# Altium PCB Zotino-DIOT.PCBDOC (part 6 of 11)
Units mil, origin at the board's own origin, x right, y up, seen from the top; angles counter-clockwise.
Board outline 8771.61 x 3949.04 mil, 4 copper layers (TopLayer, Internal Plane 2, Signal Layer 1, BottomLayer), stack 61.54 mil thick; 915 components, 534 nets, 3073 pads, 1180 vias.
Unrouted connection lines stored in the file: 36.
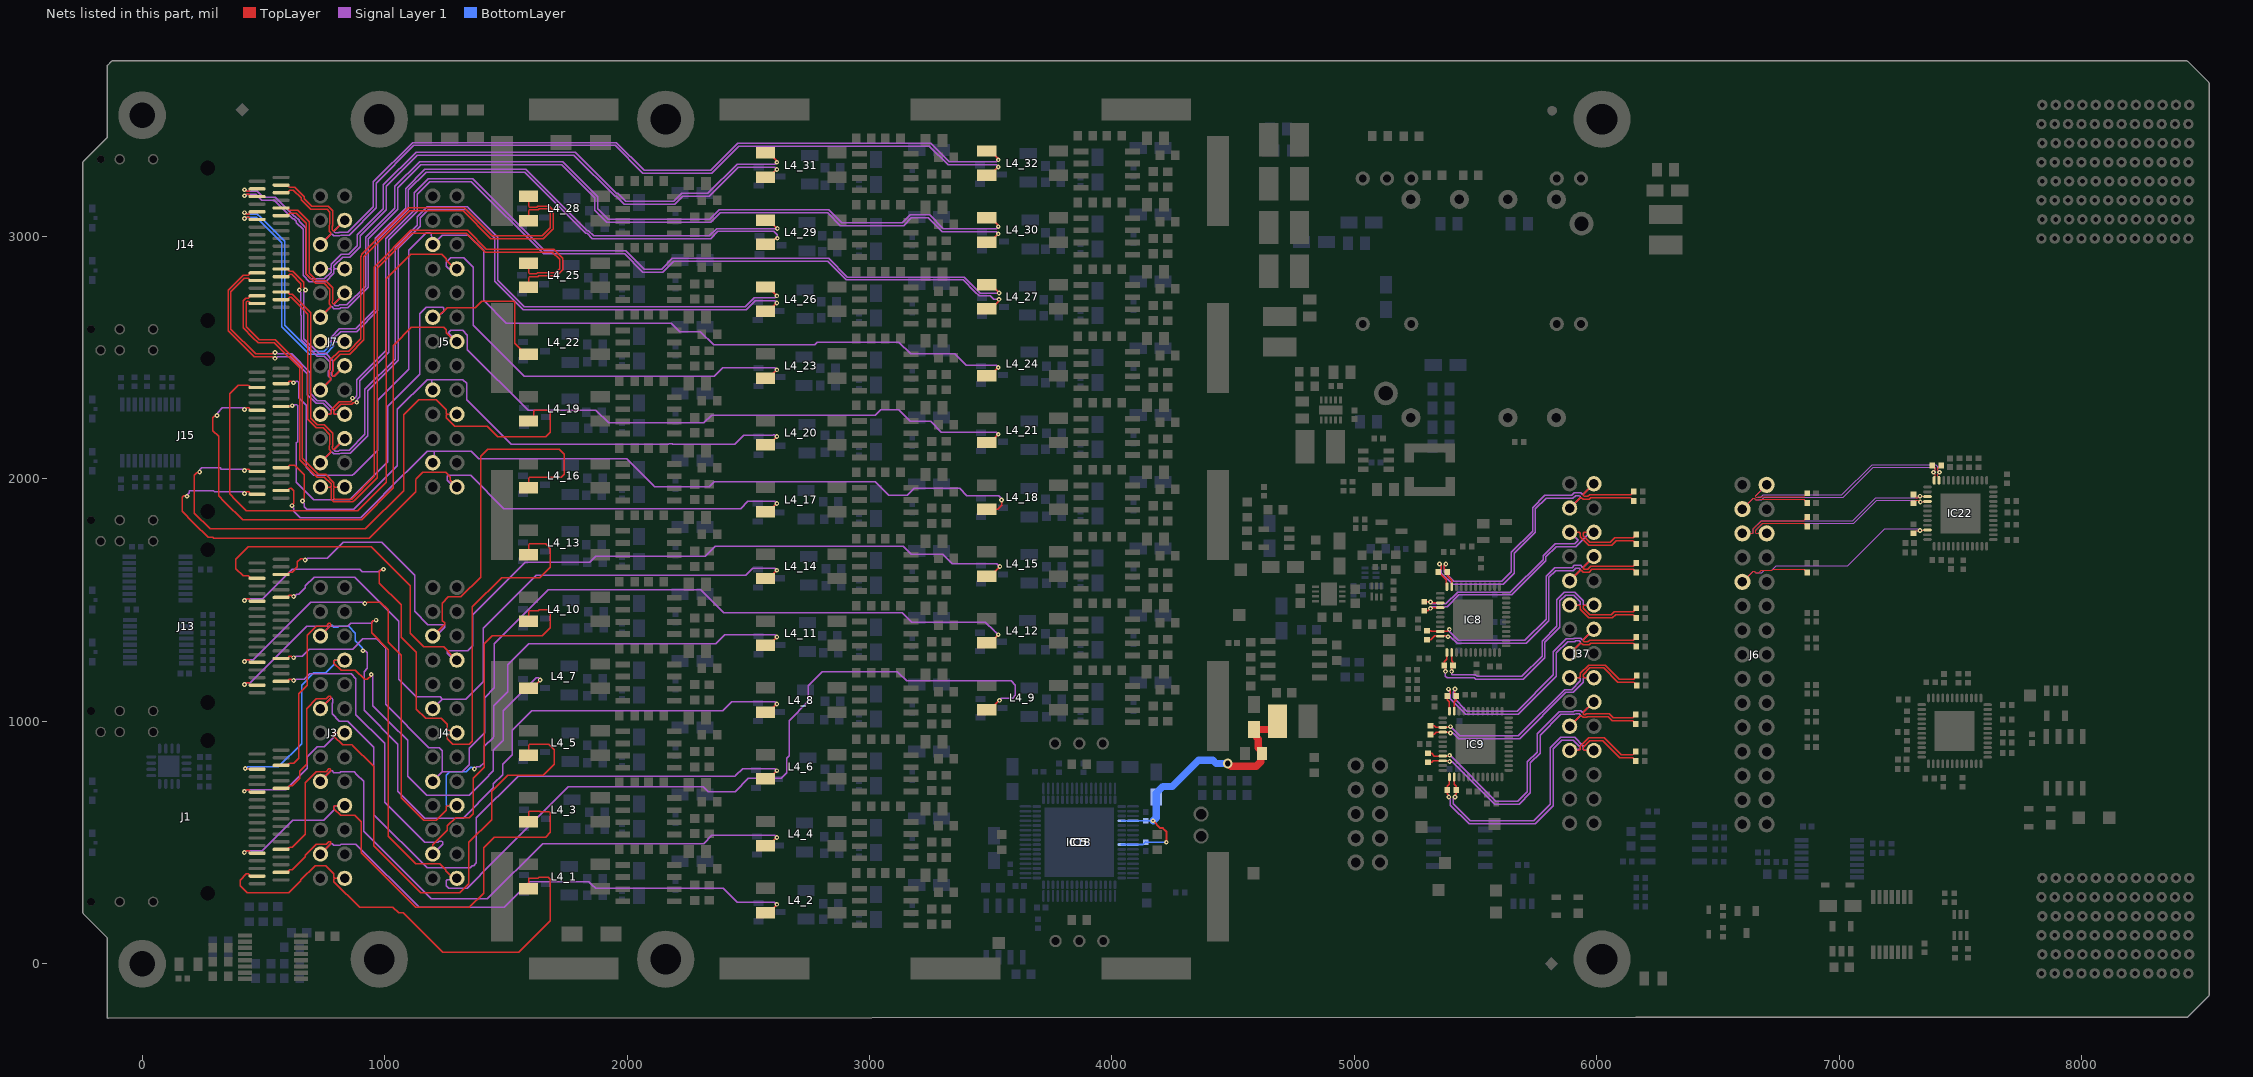
[diagram p7: the nets of this part, all layers, seen from the top]

## Via types
v1: diameter 19.68, hole 7.87, TopLayer to BottomLayer, tented both sides, 1050 vias
v2: diameter 23.62, hole 11.81, TopLayer to BottomLayer, tented both sides, 56 vias
v3: diameter 23.62, hole 11.81, TopLayer to BottomLayer, 28 vias
v4: diameter 39.37, hole 23.62, TopLayer to BottomLayer, tented both sides, 28 vias
v5: diameter 39.37, hole 19.68, TopLayer to BottomLayer, tented both sides, 7 vias
v6: diameter 19.68, hole 7.87, TopLayer to BottomLayer, tented bottom, 7 vias
v7: diameter 19.68, hole 7.87, TopLayer to BottomLayer, 4 vias

## Nets (pads, with @x,y where several pads share a name; then routed paths per layer and width w, separated by ;. In a path a pad name is that pad's centre, name@x,y a point inside that pad or via, vN(x,y) a via of type N, cw(c..) or ccw(c..) an arc to the next point about the centre after c; other vN are vias at no path point) (continued)
DAC_OUT_N25: J7.2 J14.A3 L4_25.3 | length 3307.9
  TopLayer w6: J14.A3@474.17,2755.44 447.74,2755.44 441.74,2749.45 441.74,2749.21 438.23,2745.69 427.94,2745.69 417.39,2735.15 417.39,2622.72 457.07,2583.05 477.78,2562.34 544.76,2562.34 552.54,2554.56 649.15,2457.95 649.15,2079.93 692.88,2036.19 721.87,2007.2 751.97,2007.2 779.19,1979.98 779.19,1970.22 775.68,1966.71 ; J7.2@735.19,1966.71 775.68,1966.71 ; L4_25.3@1594.08,2890.12 1594.08,2849.63 1597.59,2846.12 1626.41,2846.12 1630.73,2850.43 1675.07,2850.43 1675.3,2850.66 1704.72,2850.66 1722.03,2867.97 1722.03,2905.7 1691.75,2935.97 1414.41,2935.97 1337.38,3013 1112.84,3013 969.68,2869.84 969.68,2005.86 962.65,1998.83 875.97,1912.15 868.94,1905.12 790.36,1905.12 779.19,1916.29 779.19,1963.19 775.68,1966.71
DAC_OUT_N26: J7.5 J14.B3 L4_26.3 | length 3909.2
  TopLayer w6: J14.B3@572.99,2771.19 599.43,2771.19 605.43,2765.19 605.43,2764.96 608.94,2761.44 619.23,2761.44 672.2,2708.47 695.7,2684.97 695.7,2650.35 695.93,2650.11 695.93,2571.93 cw(c677.93,2571.93) 695.87,2570.36 ; 695.86,2570.31 ccw(c735.19,2566.71) 695.7,2566.71 695.7,2283.07 695.7,2250.35 711.83,2234.22 722.45,2223.59 751.14,2223.59 786.69,2188.04 786.69,2135.17 783.44,2131.92 783.44,2126.95 786.95,2123.44 791.92,2123.44 J7.5@835.19,2166.71 ; L4_26.3@2570.45,2791.69 2581.53,2791.69 v1(2617.93,2755.3)
  Signal Layer 1 w6: J7.5@835.19,2166.71 791.92,2123.44 791.92,2118.47 795.44,2114.95 810.61,2114.95 813.86,2118.2 853.3,2118.2 919.04,2183.94 919.04,2369.35 1044.29,2494.6 1044.29,2955.71 1051.32,2962.74 1135.64,3047.06 1135.64,3081.81 1142.67,3088.84 1168.57,3114.74 1175.6,3121.77 1341.93,3121.77 1345.44,3118.26 1464.33,2999.37 1466.49,2997.21 1466.49,2819.96 1576.56,2709.89 2487.22,2709.89 2523.87,2746.53 2609.16,2746.53 v1(2617.93,2755.3)
DAC_OUT_N27: J7.8 J14.A6 L4_27.3 | length 4852.9
  TopLayer w6: J14.A6@474.17,2849.93 447.74,2849.93 441.74,2843.93 441.74,2843.7 438.23,2840.18 416.71,2840.18 354.14,2777.61 354.14,2612.16 427.54,2538.76 462.55,2503.75 539.37,2503.75 545.71,2497.41 v1(548.23,2497.41) ; J7.8@735.19,2266.71 775.68,2266.71 779.19,2270.22 779.19,2284.95 813.45,2319.2 859.71,2319.2 864.68,2324.17 864.68,2330.67 v1(867.3,2333.29) ; L4_27.3@3483.84,2801.54 3488.38,2797 3506,2797 3535,2768 v1(3535,2767)
  Signal Layer 1 w6: v1(548.23,2497.41) 551.93,2497.41 558.27,2503.75 611.41,2503.75 669.29,2445.87 681.1,2434.06 681.1,2347.97 717.59,2311.48 747.69,2311.48 779.19,2279.98 779.19,2270.22 775.68,2266.71 J7.8@735.19,2266.71 ; v1(867.3,2333.29) 869.92,2335.91 878.68,2335.91 886.07,2343.3 886.07,2409.7 1004.92,2528.54 1004.92,2991.14 1011.95,2998.17 1122.88,3109.1 1122.88,3180.13 1180.46,3237.71 1363.21,3237.71 1366.72,3234.19 1660,2940.92 1994.56,2940.92 2070,2865.48 2142.48,2865.48 2186.89,2909.89 2831.97,2909.89 2908.86,2833 3391.6,2833 3457.6,2767 v1(3535,2767)
DAC_OUT_N28: J7.11 J14.B6 L4_28.3 | length 2439.1
  TopLayer w6: J14.B6@572.99,2865.68 599.43,2865.68 605.43,2859.68 605.43,2859.44 608.94,2855.93 621.67,2855.93 666.55,2811.06 666.55,2789.88 673.23,2783.2 v1(673.23,2779.53) ; J7.11@835.19,2466.71 791.92,2423.44 786.95,2423.44 783.44,2426.95 783.44,2442.12 788.2,2446.89 788.2,2485.8 817.62,2515.21 856.52,2515.21 914.56,2573.25 914.56,2915.59 cw(c920.56,2915.59) 916.3,2919.82 919.83,2923.34 1102.69,3106.2 1323.55,3106.2 1438.76,2991 1654.97,2991 1691.32,3027.35 1694.83,3030.86 1694.83,3109.77 1691.32,3113.29 1678.81,3125.79 1632.49,3125.79 1628.4,3121.71 1597.59,3121.71 1594.08,3125.23 L4_28.3@1594.08,3165.71
  Signal Layer 1 w6: v1(673.23,2779.53) 673.23,2775.82 666.95,2769.55 666.95,2681.19 667.32,2680.82 667.32,2578.72 727.84,2518.2 756.52,2518.2 786.69,2488.04 786.69,2445.38 779.92,2438.61 779.92,2430.47 786.95,2423.44 791.92,2423.44 J7.11@835.19,2466.71
DAC_OUT_N29: J7.14 J14.A14 L4_29.3 | length 3518.8
  TopLayer w6: v1(422.48,3098.49) 425.87,3098.49 432.21,3092.15 441.01,3092.15 441.74,3092.88 441.74,3095.9 447.74,3101.9 J14.A14@474.17,3101.9 ; L4_29.3@2570.46,3067.28 2585.72,3067.28 v1(2620,3033)
  Signal Layer 1 w6: J7.14@735.19,2566.71 775.68,2566.71 779.19,2570.22 779.19,2584.95 813.45,2619.2 880.03,2619.2 960.63,2699.8 960.63,2991.95 967.66,2998.98 1086.17,3117.49 1086.17,3197.16 1166.1,3277.09 1582.44,3277.09 1834.97,3024.57 1839.94,3024.57 1862.03,3002.48 2339.48,3002.48 2370,3033 v1(2620,3033)
  BottomLayer w6: v1(422.48,3098.49) 426.18,3098.49 432.53,3092.15 474.78,3092.15 488.19,3078.74 587.23,2979.7 587.23,2633.44 694.45,2526.21 751.97,2526.21 779.19,2553.44 779.19,2563.19 775.68,2566.71 J7.14@735.19,2566.71
DAC_OUT_N30: J7.17 J14.B14 L4_30.3 | length 4103.1
  TopLayer w6: J14.B14@572.99,3117.65 599.43,3117.65 605.43,3111.65 605.43,3111.41 608.94,3107.9 641.36,3107.9 689.17,3060.09 689.17,2849.22 718.5,2819.88 720.18,2818.2 756.52,2818.2 786.69,2788.04 786.69,2735.17 783.44,2731.92 783.44,2726.95 786.95,2723.44 791.92,2723.44 J7.17@835.19,2766.71 ; L4_30.3@3483.84,3077.13 3500.87,3077.13 3531.31,3046.69 v1(3531.31,3040.73)
  Signal Layer 1 w6: J7.17@835.19,2766.71 791.92,2723.44 791.92,2718.47 795.44,2714.95 810.61,2714.95 813.86,2718.2 843.96,2718.2 921.26,2795.5 921.26,2996.64 928.29,3003.67 1041.58,3116.96 1041.58,3206.31 1144.05,3308.78 1735.05,3308.78 1749.62,3294.2 1879.06,3164.77 1879.06,3113.94 1921.6,3071.4 2341.32,3071.4 2379.8,3109.89 2831.84,3109.89 2884.73,3057 3136.03,3057 3168.03,3089 3248,3089 3305.03,3031.97 3522.55,3031.97 v1(3531.31,3040.73)
DAC_OUT_N31: J7.20 J14.A17 L4_31.3 | length 3099.9
  TopLayer w6: v1(422.48,3192.98) 425.87,3192.98 432.21,3186.64 441.01,3186.64 441.74,3187.37 441.74,3190.39 447.74,3196.39 J14.A17@474.17,3196.39 ; L4_31.3@2570.63,3344.81 2585.59,3344.81 2617.93,3312.48 v1(2617.93,3306.48)
  Signal Layer 1 w6: v1(422.48,3192.98) 426.18,3192.98 432.53,3186.64 473.99,3186.64 499.02,3161.61 549.26,3161.61 627.37,3083.5 630.22,3083.5 647.11,3066.6 647.11,3063.76 675.39,3035.48 675.39,2845.47 694.65,2826.21 751.97,2826.21 779.19,2853.44 779.19,2863.19 775.68,2866.71 ; J7.20@735.19,2866.71 775.68,2866.71 ; v1(2617.93,3306.48) 2609.16,3297.72 2453.67,3297.72 2333.84,3177.89 2225.03,3177.89 2192.14,3145 1993.67,3145 1960.78,3177.89 1955.81,3177.89 1801.49,3332.2 1785.55,3348.15 1129.68,3348.15 994.04,3212.51 994.04,3114.65 893.84,3014.45 886.81,3007.42 886.81,2962.47 851.55,2927.21 821.46,2927.21 779.19,2884.95 779.19,2870.22 775.68,2866.71
DAC_OUT_N32: J7.23 J14.B17 L4_32.3 | length 3629.5
  TopLayer w6: J14.B17@572.99,3212.13 599.43,3212.13 605.43,3206.14 605.43,3205.9 608.94,3202.39 628.99,3202.39 667.51,3163.86 667.51,3156.5 699.99,3124.02 768.04,3124.02 786.69,3105.36 786.69,3045.38 783.44,3042.12 783.44,3026.95 786.95,3023.44 791.92,3023.44 J7.23@835.19,3066.71 ; L4_32.3@3483.84,3352.72 3500.28,3352.72 3531.31,3321.69 v1(3531.31,3316.32)
  Signal Layer 1 w6: J7.23@835.19,3066.71 791.92,3023.44 791.92,3018.47 795.44,3014.95 810.61,3014.95 813.86,3018.2 848.91,3018.2 953.39,3122.68 953.39,3225.6 1115.31,3387.52 1956.18,3387.52 2070,3273.7 2344.65,3273.7 2455.95,3385 3251.73,3385 3329.17,3307.56 3522.55,3307.56 v1(3531.31,3316.32)
DAC_OUT_P1: J1.A2 J3.1 L4_1.4 | length 2018.3
  TopLayer w6: J1.A2@474.17,361.74 447.74,361.74 441.74,367.73 441.74,367.97 438.23,371.49 429.56,371.49 403.54,345.47 403.54,322.83 433.46,292.92 604.57,292.92 654.77,343.12 654.77,346.35 713.45,405.03 756.94,405.03 791.19,370.78 791.19,356.05 794.71,352.53 ; J3.1@835.19,352.53 794.71,352.53 ; L4_1.4@1594.08,309.81 1594.08,350.29 1597.59,353.81 1633.41,353.81 1635.96,356.36 1675.37,356.36 1682.83,348.9 1682.83,176.88 1553.84,47.89 1238.81,47.89 1076.7,210 1057.44,210 1034.55,232.89 897.57,232.89 791.19,339.26 791.19,349.02 794.71,352.53
DAC_OUT_P2: J1.B2 J3.4 L4_2.4 | length 2488.7
  TopLayer w6: J1.B2@572.99,377.49 599.43,377.49 605.43,383.48 605.43,383.72 608.94,387.24 619.23,387.24 673.07,441.07 673.07,447.68 718.42,493.03 758.72,493.03 769.98,504.29 774.95,504.29 778.47,500.78 778.47,495.81 J3.4@735.19,452.53 ; L4_2.4@2570.46,211.38 2586.38,211.38 2617.93,242.93 v1(2617.93,245.46)
  Signal Layer 1 w6: J3.4@735.19,452.53 778.47,495.81 783.44,495.81 790.47,488.78 815.58,488.78 820.49,493.69 881.19,493.69 1141.99,232.89 1493.95,232.89 1599.65,338.58 1842.52,338.58 1854.33,326.77 1870.08,311.02 2397.64,311.02 2425.2,283.46 2454.44,254.22 2607.57,254.22 2616.33,245.46 v1(2617.93,245.46)
DAC_OUT_P3: J1.A5 J3.7 L4_3.4 | length 2205.5
  TopLayer w6: v1(421.26,459.63) 424.96,459.63 431.31,465.98 440.1,465.98 441.74,464.34 441.74,462.22 447.74,456.23 J1.A5@474.17,456.23 ; J3.7@835.19,652.53 794.71,652.53 791.19,649.02 791.19,639.26 818.42,612.04 851.97,612.04 852.14,612.21 875.84,612.21 902.75,585.3 902.75,458.71 1128.46,233 1350,233 1408.29,291.29 1408.29,478.26 1453.03,523 1663.91,523 1682.83,541.92 1682.83,624.49 1679.37,627.94 1640.97,627.94 1639.52,629.4 1597.59,629.4 1594.08,625.88 L4_3.4@1594.08,585.4
  Signal Layer 1 w6: v1(421.26,459.63) 424.96,459.63 431.31,465.98 494.76,465.98 620.81,592.03 748.93,592.03 791.19,634.29 791.19,649.02 794.71,652.53 J3.7@835.19,652.53
DAC_OUT_P4: J1.B5 J3.10 L4_4.4 | length 2951.5
  TopLayer w6: J1.B5@572.99,471.98 599.43,471.98 605.43,477.97 605.43,478.21 608.94,481.72 619.23,481.72 671.61,534.11 671.61,746.22 718.42,793.03 758.72,793.03 769.98,804.29 774.95,804.29 778.47,800.78 778.47,795.81 J3.10@735.19,752.53 ; L4_4.4@2570.45,486.97 2583.85,486.97 v1(2617.93,521.05)
  Signal Layer 1 w6: J3.10@735.19,752.53 778.47,795.81 783.44,795.81 790.47,788.78 815.58,788.78 818.83,792.03 874.31,792.03 885.83,780.51 913.2,753.14 913.2,547.43 1192.91,267.72 1424.38,267.72 1652.55,495.89 2315.77,495.89 2349.69,529.81 2609.16,529.81 v1(2617.93,521.05)
DAC_OUT_P5: J1.A13 J3.13 L4_5.4 | length 2639.5
  TopLayer w6: v1(421.26,711.6) 424.96,711.6 431.31,717.94 440.1,717.94 441.74,716.31 441.74,714.19 447.74,708.2 J1.A13@474.17,708.2 ; J3.13@835.19,952.53 794.71,952.53 791.19,949.02 791.19,939.26 826.43,904.03 865.94,904.03 869.49,900.49 951.4,818.57 954.91,815.06 954.91,486.38 1148.29,293 1310,293 1348,331 1348,500.57 1442.49,595.06 1442.49,712.46 1507.16,777.13 1654.45,777.13 1700,822.68 1700,882.91 1693.44,889.47 1677.92,904.99 1597.59,904.99 1594.08,901.47 L4_5.4@1594.08,860.99
  Signal Layer 1 w6: v1(421.26,711.6) 424.96,711.6 431.31,717.94 591.48,717.94 680.39,806.86 680.39,853.59 721.67,894.87 751.77,894.87 791.19,934.29 791.19,949.02 794.71,952.53 J3.13@835.19,952.53
DAC_OUT_P6: J1.B13 J3.16 L4_6.4 | length 3321.5
  TopLayer w6: J1.B13@572.99,723.94 599.43,723.94 605.43,729.94 605.43,730.18 608.94,733.69 619.23,733.69 650.47,764.93 650.47,794.97 678.34,822.83 678.34,1052.95 718.42,1093.03 758.72,1093.03 769.98,1104.29 774.95,1104.29 778.47,1100.78 778.47,1095.81 J3.16@735.19,1052.53 ; L4_6.4@2570.46,762.56 2583.85,762.56 v1(2617.93,796.64)
  Signal Layer 1 w6: J3.16@735.19,1052.53 778.47,1095.81 783.44,1095.81 786.95,1092.29 786.95,1077.12 783.7,1073.87 783.7,1031.2 813.86,1001.04 847.39,1001.04 874.69,973.73 954.54,893.89 954.54,615.85 1175.15,395.23 1353.7,395.23 1362.36,403.89 1366.81,403.89 1378.84,415.92 1378.84,602.18 1551.04,774.37 2445.32,774.37 2448.84,777.89 2476.35,805.4 2609.16,805.4 v1(2617.93,796.64)
DAC_OUT_P7: J1.A16 J3.19 L4_7.4 | length 2511.1
  TopLayer w6: v1(425.2,806.09) 427.11,804.17 472.69,804.17 J1.A16@474.17,802.68 ; J3.19@835.19,1252.53 794.71,1252.53 791.19,1249.02 791.19,1239.26 820.14,1210.32 879.89,1210.32 917.32,1172.89 928.84,1172.89 945,1189.05 v1(945,1192.89) ; L4_7.4@1576.42,1136.58 L4_7.4@1594.08,1136.58 1607.47,1136.58 v1(1641.55,1170.65)
  Signal Layer 1 w6: v1(945,1192.89) 951.84,1186.05 951.84,1065.02 1023.64,993.22 1095.47,921.38 1095.47,774.58 1174.16,695.89 1348.81,695.89 1410.84,757.92 1448.84,795.92 1448.84,880.78 1485.23,917.17 1488.74,920.68 1488.74,1043.15 1625,1179.42 1632.78,1179.42 v1(1641.55,1170.65)
  BottomLayer w6: v1(425.2,806.09) 428.9,806.09 435.24,812.43 454.05,812.43 561.69,812.43 657.48,908.23 657.48,1149.42 708.1,1200.04 756.94,1200.04 791.19,1234.29 791.19,1249.02 794.71,1252.53 J3.19@835.19,1252.53 ; v1@945,1188 v1(945,1192.89)
DAC_OUT_P8: J1.B16 J3.22 L4_8.4 | length 3678.6
  TopLayer w6: J1.B16@572.99,818.43 599.43,818.43 605.43,824.43 605.43,824.67 608.94,828.18 624.68,828.18 644.87,848.38 644.87,1113.38 680.31,1148.81 680.31,1354.92 718.42,1393.03 758.72,1393.03 769.98,1404.29 774.95,1404.29 778.47,1400.78 778.47,1395.81 J3.22@735.19,1352.53 ; L4_8.4@2570.45,1038.15 2583.85,1038.15 v1(2617.93,1072.23)
  Signal Layer 1 w6: v1(910.43,1291.34) 912.92,1288.85 922.6,1288.85 928.6,1282.85 928.6,1218.69 915.15,1205.25 915.15,1046.27 1054.93,906.49 1054.93,711.56 1067,699.5 1165.46,601.04 1323.96,601.04 1448.84,725.92 1448.84,742.18 1486.84,780.18 1486.84,822.84 1526.74,862.74 1526.74,964.02 1607.1,1044.37 2395.32,1044.37 2398.84,1047.89 2431.94,1080.99 2609.16,1080.99 v1(2617.93,1072.23)
  BottomLayer w6: J3.22@735.19,1352.53 778.47,1395.81 783.44,1395.81 790.47,1388.78 807.99,1388.78 811.25,1392.03 851.55,1392.03 879.62,1363.96 879.62,1331.83 907.95,1303.5 907.95,1293.82 v1(910.43,1291.34)
DAC_OUT_P9: J4.1 J13.A2 L4_9.4 | length 5180.5
  TopLayer w6: v1(422.17,1152.55) 425.87,1152.55 432.21,1158.89 441.01,1158.89 441.74,1158.16 441.74,1155.14 447.74,1149.14 J13.A2@474.17,1149.14 ; v1(965.29,1417.58) 962.67,1414.97 953.7,1414.97 947.48,1408.75 947.48,1364.77 1015.84,1296.41 1015.84,525.89 1128.69,413.04 1227.46,413.04 1251.8,388.69 1251.8,383.72 1282.99,352.53 J4.1@1298.29,352.53 ; L4_9.4@3483.84,1047.99 3497.24,1047.99 v1(3536.16,1086.91)
  Signal Layer 1 w6: v1(422.17,1152.55) 425.87,1152.55 432.21,1158.89 446.53,1158.89 679.67,1392.03 847.52,1392.03 860.72,1405.23 943.97,1405.23 953.7,1414.97 962.67,1414.97 v1(965.29,1417.58) ; J4.1@1298.29,352.53 1292.26,346.51 1257.8,346.51 1254.28,343 1254.28,321.74 1264.81,311.21 1340.06,311.21 1393.84,365 1393.84,366.41 1758.49,731.06 2172.29,731.06 2172.61,730.75 2187.39,730.75 2187.71,731.06 2314.03,731.06 2334.73,710.35 2446.3,710.35 2500.84,764.89 2635.84,764.89 2658.84,787.89 2658.84,847.89 2668.84,857.89 2668.84,1002.89 2748,1082.05 2748,1147.97 2801.51,1201.49 2805.03,1205 3114.97,1205 3118.49,1201.49 3153.02,1166.95 3584.97,1166.95 3602.31,1149.61 3602.31,1106.77 3590.31,1094.77 3544.01,1094.77 v1(3536.16,1086.91)
DAC_OUT_P10: J4.4 J13.B2 L4_10.4 | length 2764.1
  TopLayer w6: J13.B2@572.99,1164.89 599.43,1164.89 605.43,1170.88 605.43,1173.91 606.16,1174.64 614.95,1174.64 621.3,1168.3 v1(625,1168.3) ; J4.4@1198.29,452.53 1198.29,491.29 1258.79,551.79 1258.79,568.89 1292.89,603 1350,603 1365.8,618.8 1365.8,765.77 1410.84,810.81 1410.84,1320.81 1443.03,1353 1650,1353 1682.83,1385.83 1682.83,1451.26 1673.84,1460.25 1637.46,1460.25 1633.37,1456.17 1597.59,1456.17 1594.08,1452.65 L4_10.4@1594.08,1412.17
  Signal Layer 1 w6: v1(625,1168.3) 628.7,1168.3 635.05,1174.64 668.73,1174.64 690.38,1196.29 861.78,1196.29 881.89,1176.18 881.89,1028 1000,909.89 1000,666.1 1067.61,598.49 1165.06,501.04 1219.62,501.04 1224.47,505.89 1235.84,505.89 1238.84,502.89 1238.84,493.09 J4.4@1198.29,452.53
DAC_OUT_P11: J4.7 J13.A5 L4_11.4 | length 3894.7
  TopLayer w6: v1(422.17,1247.04) 425.87,1247.04 432.21,1253.38 441.01,1253.38 441.74,1252.65 441.74,1249.62 447.74,1243.63 J13.A5@474.17,1243.63 ; v1(918.31,1485.69) 922.01,1485.69 928.35,1492.03 982.38,1492.03 1014.57,1459.83 1014.57,1326.96 1029.22,1312.31 1068.71,1272.83 1068.71,684.01 1117.19,635.52 1160.68,592.03 1212.02,592.03 1254.29,634.29 1254.29,649.02 1257.8,652.53 J4.7@1298.29,652.53 ; L4_11.4@2570.45,1313.74 2583.85,1313.74 v1(2617.93,1347.82)
  Signal Layer 1 w6: v1(422.17,1247.04) 425.87,1247.04 432.21,1253.38 457.36,1253.38 696.01,1492.03 908.26,1492.03 914.6,1485.69 v1(918.31,1485.69) ; v1(1370,803) 1371.36,803 1380.36,812 1392.62,812 1410.84,830.22 1410.84,896.52 1447.23,932.91 1450.74,936.42 1450.74,1065.14 1508.51,1122.91 1508.51,1234.54 1594.86,1320.89 2366.84,1320.89 2402.53,1356.58 2609.16,1356.58 v1(2617.93,1347.82)
  BottomLayer w6: J4.7@1298.29,652.53 1257.8,652.53 1254.29,656.05 1254.29,777.65 1268.67,792.03 1336.63,792.03 1350.5,805.9 1350.5,806.61 1354.67,810.78 1359.64,810.78 1367.43,803 v1(1370,803)
DAC_OUT_P12: J4.10 J13.B5 L4_12.4 | length 4151
  TopLayer w6: J13.B5@572.99,1259.38 599.43,1259.38 605.43,1265.37 605.43,1268.39 606.16,1269.13 614.95,1269.13 621.3,1262.78 v1(625,1262.78) ; L4_12.4@3483.84,1323.58 3497.24,1323.58 v1(3531.31,1357.66)
  Signal Layer 1 w6: v1(625,1262.78) 628.7,1262.78 635.05,1269.13 659.87,1269.13 688.79,1298.04 867.92,1298.04 910.43,1340.55 967.52,1340.55 984.25,1323.82 1003.84,1304.23 1003.84,1069.71 1181.52,892.03 1224.66,892.03 1237.78,878.91 1237.78,792.03 ; J4.10@1198.29,752.53 1237.78,792.03 ; v1(3531.31,1357.66) 3519.6,1369.37 3517.35,1369.37 3513.84,1372.89 3477.32,1409.4 3173.6,1409.4 3135.11,1447.89 2397.87,1447.89 2303.76,1542 1674.92,1542 1475.58,1342.66 1473.76,1340.84 1472.61,1340.84 1452.84,1321.07 1452.84,1137.95 1412.74,1097.85 1412.74,952.16 1409.23,948.65 1349.98,889.4 1349.98,822.06 1319.95,792.03 1237.78,792.03
DAC_OUT_P13: J4.13 J13.A13 L4_13.4 | length 2904
  TopLayer w6: v1(422.17,1499) 425.87,1499 432.21,1505.35 441.01,1505.35 441.74,1504.61 441.74,1501.59 447.74,1495.6 J13.A13@474.17,1495.6 ; v1(994.92,1627.68) 992.3,1625.06 986.22,1625.06 978.56,1617.39 978.56,1570.66 1067.84,1481.37 1067.84,1347.12 1130.84,1284.12 1130.84,1050.89 1168.84,1012.89 1232.76,1012.89 1257.66,987.99 1257.66,965.29 1259.51,963.44 1287.38,963.44 J4.13@1298.29,952.53 1289.93,944.18 1257.66,944.18 1257.66,928.91 1281.63,904.93 1348.54,904.93 1362.29,918.68 1362.29,1472.26 1483.03,1593 1639.1,1593 1682.83,1636.73 1682.83,1712.6 1663.68,1731.76 1597.59,1731.76 1594.08,1728.24 L4_13.4@1594.08,1687.76
  Signal Layer 1 w6: v1(422.17,1499) 425.87,1499 432.21,1505.35 496.73,1505.35 619.23,1627.85 896.52,1627.85 907.87,1616.49 974.72,1616.49 983.28,1625.06 992.3,1625.06 v1(994.92,1627.68)
DAC_OUT_P14: J4.16 J13.B13 L4_14.4 | length 2914.9
  TopLayer w6: J13.B13@572.99,1511.35 599.43,1511.35 605.43,1517.34 605.43,1520.36 606.16,1521.09 614.95,1521.09 621.3,1514.75 v1(625,1514.75) ; L4_14.4@2570.45,1589.33 2583.85,1589.33 v1(2617.93,1623.41)
  Signal Layer 1 w6: v1(625,1514.75) 628.7,1514.75 637.42,1523.47 645.3,1523.47 673.38,1551.55 673.38,1559.21 709.65,1595.47 877.16,1595.47 1058.84,1413.79 1058.84,1172.92 1130.87,1100.89 1229.12,1100.89 1237.95,1092.06 ; J4.16@1198.29,1052.53 1198.43,1052.53 1237.93,1092.03 ; v1(2617.93,1623.41) 2609.16,1632.17 2518.84,1632.17 2489.56,1602.89 1625.61,1602.89 1406.35,1383.63 1406.35,1163.43 1402.84,1159.92 1334.95,1092.03 1237.93,1092.03
DAC_OUT_P15: J4.19 J13.A16 L4_15.4 | length 4084.3
  TopLayer w6: J13.A16@474.17,1590.09 447.74,1590.09 441.74,1596.08 441.74,1596.32 438.23,1599.83 416.66,1599.83 386.62,1629.87 386.62,1668.36 438.42,1720.16 944.64,1720.16 1105.84,1558.96 1105.84,1362.86 1160.81,1307.89 1242.93,1307.89 1281.6,1269.22 J4.19@1298.29,1252.53 ; L4_15.4@3483.84,1599.17 3498.27,1599.17 v1(3537.66,1638.56)
  Signal Layer 1 w6: J4.19@1298.29,1252.53 1286.57,1252.53 1258.84,1280.26 1258.84,1290.89 1343.81,1290.89 1363.84,1310.92 1363.84,1439.87 1579.86,1655.89 1846.84,1655.89 1871.84,1680.89 2321.84,1680.89 2363.84,1722.89 3140.03,1722.89 3172.87,1690.06 3302.94,1690.06 3342,1651 3525.22,1651 v1(3537.66,1638.56)
DAC_OUT_P16: J4.22 J13.B16 L4_16.4 | length 2553.6
  TopLayer w6: J13.B16@572.99,1605.83 599.43,1605.83 605.43,1611.83 605.43,1612.07 608.94,1615.58 619.23,1615.58 640.56,1636.91 640.56,1658.79 653.4,1671.63 662.27,1671.63 668.54,1665.35 v1(672.24,1665.35) ; J4.22@1198.29,1352.53 1247.24,1401.49 1247.24,1406.46 1238,1415.71 1238,1487.97 1263.07,1513.04 1314.64,1513.04 1396.29,1594.68 1396.29,2093 1426.29,2123 1720,2123 1742,2101 1742,2019.81 1729.54,2007.35 1597.59,2007.35 1594.08,2003.83 L4_16.4@1594.08,1963.35
  Signal Layer 1 w6: v1(672.24,1665.35) 675.92,1665.35 682.6,1672.04 762.83,1672.04 828.79,1738 988.73,1738 1123.84,1602.89 1123.84,1454.15 1178.9,1399.1 1245.87,1399.1 1247.8,1397.17 1247.8,1387.33 1213,1352.53 J4.22@1198.29,1352.53
DAC_OUT_P17: J5.1 J15.A2 L4_17.4 | length 3320.8
  TopLayer w6: v1(184.4,1928.6) 182.54,1930.45 170.5,1930.45 164.28,1924.23 164.28,1866.23 211.31,1819.2 215.55,1814.96 271.8,1758.71 291.16,1758.71 294.29,1755.57 936.48,1755.57 1127.95,1947.04 1127.95,1997 1131.47,2000.52 1158.16,2027.21 1251.49,2027.21 1270.84,2007.86 1270.84,1994.15 J5.1@1298.29,1966.71 ; v1(422.17,1939.95) 425.87,1939.95 432.21,1946.29 441.01,1946.29 441.74,1945.56 441.74,1942.54 447.74,1936.54 J15.A2@474.17,1936.54 ; L4_17.4@2570.45,1864.92 2583.85,1864.92 v1(2617.93,1899)
  Signal Layer 1 w6: v1(184.4,1928.6) 184.4,1932.3 194.42,1942.32 194.42,1950.88 294.1,1950.88 298.69,1946.29 412.12,1946.29 418.46,1939.95 v1(422.17,1939.95) ; J5.1@1298.29,1966.71 1284.69,1966.71 1257.64,1993.76 1257.64,2010.73 1262.12,2015.21 1354.55,2015.21 1491.87,1877.89 2468.97,1877.89 2498.84,1907.76 2609.16,1907.76 v1(2617.93,1899)
DAC_OUT_P18: J5.4 J15.B2 L4_18.4 | length 3467
  TopLayer w6: J15.B2@572.99,1952.29 599.43,1952.29 605.43,1958.29 605.43,1958.52 608.94,1962.04 614.26,1962.04 624.45,1951.85 624.45,1899.81 618.11,1893.47 v1(618.11,1889.76) ; L4_18.4@3483.84,1874.77 3529.77,1874.77 3546,1891 3545.03,1891.97 v1(3545.03,1912.92)
  Signal Layer 1 w6: v1(618.11,1889.76) 618.11,1886.06 624.45,1879.72 624.45,1865.95 651.19,1839.21 901.89,1839.21 997.39,1934.72 997.39,1936.13 1175.67,2114.4 1204.55,2114.4 ; J5.4@1198.29,2066.71 1204.55,2072.98 1204.55,2114.4 ; v1(3545.03,1912.92) 3545.03,1918.59 3532.62,1931 3402,1931 3372,1961 3184.97,1961 3156.26,1932.29 3080.14,1932.29 3023.03,1989.4 2360.35,1989.4 2342.81,1971.86 2339.3,1968.35 2112.65,1968.35 2109.13,1971.86 1997.87,2083.12 1388.62,2083.12 1357.34,2114.4 1204.55,2114.4
DAC_OUT_P19: J5.7 J15.A5 L4_19.4 | length 2686.5
  TopLayer w6: v1(237.2,2028.54) 234.59,2025.92 225.62,2025.92 214.58,2014.89 214.58,1859.04 280.05,1793.57 920.74,1793.57 1078.84,1951.67 1078.84,2264.86 1141.19,2327.21 1198.05,2327.21 ccw(c1198.29,2366.71) 1198.52,2327.21 1212.02,2327.21 1254.29,2284.95 1254.29,2270.22 1257.8,2266.71 ; v1(422.17,2034.44) 425.87,2034.44 432.21,2040.78 441.01,2040.78 441.74,2040.05 441.74,2037.03 447.74,2031.03 J15.A5@474.17,2031.03 ; J5.7@1298.29,2266.71 1257.8,2266.71 ; L4_19.4@1594.08,2238.94 1595.48,2238.94 1616.1,2259.56 1616.1,2279.42 1619.62,2282.94 1677.92,2282.94 1682.83,2278.03 1682.83,2191.63 1665.35,2174.15 1466.89,2174.15 1422.84,2218.2 1289.52,2218.2 1254.29,2253.44 1254.29,2263.19 1257.8,2266.71
  Signal Layer 1 w6: v1(237.2,2028.54) 239.82,2031.16 239.82,2040.13 246.04,2046.35 321.17,2046.35 326.74,2040.78 412.12,2040.78 418.46,2034.44 v1(422.17,2034.44)
DAC_OUT_P20: J5.10 J15.B5 L4_20.4 | length 2852.3
  TopLayer w6: J15.B5@572.99,2046.78 599.43,2046.78 605.43,2052.77 605.43,2053.01 608.94,2056.53 629.5,2056.53 656.5,2029.53 667.76,2018.26 667.76,1918.51 661.42,1912.17 v1(661.42,1908.46) ; L4_20.4@2570.45,2140.51 2583.85,2140.51 v1(2617.93,2174.59)
  Signal Layer 1 w6: v1(661.42,1908.46) 661.42,1904.76 667.76,1898.42 667.76,1884.65 678.3,1874.11 872.03,1874.11 893.81,1895.89 1048.84,2050.92 1052.35,2054.43 1052.35,2287.35 1174.92,2409.92 1193.84,2409.92 ; J5.10@1198.29,2366.71 1193.84,2362.26 1193.84,2409.92 ; v1(2617.93,2174.59) 2614.48,2174.59 2607.57,2181.5 2602.6,2181.5 2602.33,2181.23 2481.72,2181.23 2443.38,2142.89 2188.89,2142.89 2187.39,2144.39 2172.61,2144.39 2171.11,2142.89 1521.87,2142.89 1337.78,2326.98 1337.78,2350.35 1337.78,2394.41 1322.27,2409.92 1193.84,2409.92
DAC_OUT_P21: J5.13 J15.A13 L4_21.4 | length 4918.7
  TopLayer w6: v1(309.06,2261.81) 306.44,2259.19 297.47,2259.19 291.25,2252.97 291.25,2199.46 314.96,2175.75 314.96,1931.1 339.26,1906.8 343.5,1902.56 414.49,1831.57 905,1831.57 1036.42,1962.99 1036.42,2550.47 1039.93,2553.98 1110.84,2624.89 1243.81,2624.89 1247.32,2621.37 1254.28,2614.41 1254.28,2602.89 1290.47,2566.71 J5.13@1298.29,2566.71 ; v1(422.17,2286.41) 425.87,2286.41 432.21,2292.75 441.01,2292.75 441.74,2292.02 441.74,2288.99 447.74,2283 J15.A13@474.17,2283 ; L4_21.4@3483.84,2150.36 3497.24,2150.36 v1(3531.31,2184.43)
  Signal Layer 1 w6: v1(309.06,2261.81) 311.67,2264.43 311.67,2273.4 331.02,2292.75 412.12,2292.75 418.46,2286.41 v1(422.17,2286.41) ; J5.13@1298.29,2566.71 1262.1,2602.89 1272.1,2612.89 1321.84,2612.89 1341.84,2592.89 1341.84,2532.92 1345.35,2529.4 1591.87,2282.89 1871.87,2282.89 1923.87,2230.89 2316.84,2230.89 2348.84,2262.89 3024.18,2262.89 3045.81,2284.51 3121.34,2284.51 3167.97,2237.89 3251.87,2237.89 3296.56,2193.2 3522.55,2193.2 v1(3531.31,2184.43)
DAC_OUT_P22: J5.16 J15.B13 L4_22.4 | length 2326.3
  TopLayer w6: J15.B13@572.99,2298.75 574.48,2300.24 616.93,2300.24 v1(618.84,2302.15) ; J5.16@1198.29,2666.71 1218.12,2666.71 1257.61,2706.2 1374.46,2706.2 1401.43,2733.17 1533.1,2733.17 1537.78,2728.49 1537.78,2559.92 1583.18,2514.53 L4_22.4@1594.08,2514.53
  Signal Layer 1 w6: v1@624.69,2298.45 620.98,2302.15 v1(618.84,2302.15) 622.55,2302.15 627.08,2306.69 637.69,2306.69 641.2,2303.17 641.2,2153.11 636.47,2148.38 636.47,1986.32 666.41,1956.39 707.58,1915.21 812.14,1915.21 856.52,1915.21 932.76,1991.45 1012,2070.69 1012,2075.66 1012,2299.16 1144.87,2432.04 1144.87,2682.04 1170.73,2707.89 1239.47,2707.89 1243.84,2703.52 1243.84,2692.43 1218.12,2666.71 J5.16@1198.29,2666.71
DAC_OUT_P23: J5.19 J15.A16 L4_23.4 | length 4330.1
  TopLayer w6: J15.A16@474.17,2377.49 447.74,2377.49 441.74,2383.48 441.74,2383.72 438.23,2387.24 397.08,2387.24 360.24,2350.39 360.24,1937.99 385.52,1912.71 389.76,1908.46 428.65,1869.57 889.26,1869.57 1006.89,1987.2 1006.89,2826.78 1010.4,2830.3 1107.32,2927.21 1234.93,2927.21 1254.28,2907.86 1254.28,2902.89 1290.47,2866.71 J5.19@1298.29,2866.71 ; L4_23.4@2570.45,2416.1 2583.85,2416.1 v1(2617.93,2450.18)
  Signal Layer 1 w6: J5.19@1298.29,2866.71 1264.48,2866.71 1253.84,2877.35 1253.84,2894.62 1272.14,2912.92 1326.54,2912.92 1365.91,2873.55 1365.91,2633.85 1571.87,2427.89 1575.38,2424.37 2360.4,2424.37 2394.97,2458.94 2609.16,2458.94 v1(2617.93,2450.18)
DAC_OUT_P24: J5.22 J15.B16 L4_24.4 | length 4614.3
  TopLayer w6: J15.B16@572.99,2393.24 599.43,2393.24 605.43,2399.23 605.43,2402.25 606.16,2402.98 614.95,2402.98 621.3,2396.64 v1(624.69,2396.64) ; L4_24.4@3483.84,2425.95 3497.24,2425.95 v1(3531.31,2460.02)
  Signal Layer 1 w6: v1(624.69,2396.64) 628.39,2396.64 634.48,2402.73 640.01,2402.73 644.86,2397.89 644.86,2335.74 676.18,2304.41 676.18,2047.64 708.61,2015.21 734.94,2015.21 ccw(c735.19,2066.71) 735.19,2015.21 835.19,2015.21 ccw(c835.19,2066.71) 835.44,2015.21 861.34,2015.21 ccw(c861.34,2033.21) 874.09,2020.51 969.12,2115.54 972.64,2119.05 972.64,2324.76 1099.6,2451.72 1099.6,2943.85 1170.96,3015.21 1186.44,3015.21 1186.52,3015.21 cw(c1186.37,3009.21) 1192.31,3010.03 J5.22@1198.29,2966.71 1237.78,3006.2 1345.52,3006.2 1408.29,2943.44 1408.29,2736.47 1501.87,2642.89 2183.14,2642.89 2218.11,2607.92 2301.84,2607.92 2356.87,2552.89 2773.59,2552.89 2785.22,2564.51 3121.51,2564.51 3170.14,2515.89 3351.77,2515.89 3398.87,2468.79 3522.55,2468.79 v1(3531.31,2460.02)
DAC_OUT_P25: J7.1 J14.A2 L4_25.4 | length 3308.1
  TopLayer w6: J14.A2@474.17,2723.94 447.74,2723.94 441.74,2729.94 441.74,2730.18 438.23,2733.69 432.91,2733.69 429.39,2730.18 429.39,2627.69 482.75,2574.34 549.73,2574.34 557.51,2566.56 661.15,2462.92 661.15,2084.9 726.84,2019.2 756.94,2019.2 791.19,1984.95 791.19,1970.22 794.71,1966.71 ; J7.1@835.19,1966.71 794.71,1966.71 ; L4_25.4@1594.08,2790.12 1594.08,2830.6 1597.59,2834.12 1631.38,2834.12 1635.7,2838.43 1670.09,2838.43 1670.32,2838.2 1709.23,2838.2 1734.03,2863 1734.03,2910.67 1696.72,2947.97 1419.38,2947.97 1342.35,3025 1107.87,3025 961.19,2878.32 957.68,2874.81 957.68,2010.83 863.97,1917.12 795.33,1917.12 791.19,1921.26 791.19,1963.19 794.71,1966.71
DAC_OUT_P26: J7.4 J14.B2 L4_26.4 | length 3908.2
  TopLayer w6: J14.B2@572.99,2739.69 599.43,2739.69 605.43,2745.69 605.43,2745.93 608.94,2749.44 614.26,2749.44 660.2,2703.5 683.7,2680 683.7,2645.38 683.93,2645.14 683.93,2639.76 683.93,2571.93 cw(c677.93,2571.93) 683.91,2571.38 ; 683.91,2571.36 ccw(c735.19,2566.71) 683.7,2566.71 683.7,2288.04 683.7,2245.38 699.83,2229.24 717.48,2211.59 746.16,2211.59 774.69,2183.07 774.69,2140.15 771.44,2136.89 771.44,2121.98 778.47,2114.95 778.47,2109.98 J7.4@735.19,2066.71 ; L4_26.4@2570.45,2691.69 2583.85,2691.69 v1(2617.93,2725.77)
  Signal Layer 1 w6: J7.4@735.19,2066.71 778.47,2109.98 783.44,2109.98 790.47,2102.95 815.58,2102.95 818.83,2106.2 858.27,2106.2 931.04,2178.97 931.04,2364.38 1056.29,2489.63 1056.29,2950.74 1147.64,3042.08 1147.64,3076.84 1180.57,3109.77 1336.96,3109.77 1454.49,2992.24 1454.49,2814.99 1571.59,2697.89 2492.19,2697.89 2528.84,2734.53 2609.16,2734.53 v1(2617.93,2725.77)
DAC_OUT_P27: J7.7 J14.A5 L4_27.4 | length 4823.6
  TopLayer w6: J14.A5@474.17,2818.43 447.74,2818.43 441.74,2824.43 441.74,2824.67 438.23,2828.18 421.69,2828.18 366.14,2772.64 366.14,2617.13 467.52,2515.75 539.37,2515.75 545.71,2522.09 v1(548.23,2522.09) ; J7.7@835.19,2266.71 794.71,2266.71 791.19,2270.22 791.19,2279.98 818.42,2307.2 864.68,2307.2 870.83,2313.36 882.27,2313.36 v1(884.89,2315.98) ; L4_27.4@3483.84,2701.54 3501.54,2701.54 3533.72,2733.72 v1(3533.72,2740.92)
  Signal Layer 1 w6: v1(548.23,2522.09) 551.93,2522.09 558.27,2515.75 616.38,2515.75 693.1,2439.03 693.1,2352.94 722.56,2323.48 752.66,2323.48 791.19,2284.95 791.19,2270.22 794.71,2266.71 J7.7@835.19,2266.71 ; v1(884.89,2315.98) 887.51,2318.59 887.51,2327.77 898.07,2338.33 898.07,2404.72 1016.92,2523.57 1016.92,2986.17 1134.88,3104.13 1134.88,3175.16 1185.43,3225.71 1358.24,3225.71 1651.51,2932.43 1655.03,2928.92 1989.59,2928.92 2061.51,2857 2065.03,2853.48 2147.45,2853.48 2150.97,2857 2191.86,2897.89 2827,2897.89 2903.89,2821 3386.63,2821 3434.63,2773 3452.63,2755 3498,2755 3512.08,2740.92 v1(3533.72,2740.92)
DAC_OUT_P28: J7.10 J14.B5 L4_28.4 | length 2418.7
  TopLayer w6: J14.B5@572.99,2834.18 599.43,2834.18 605.43,2840.18 605.43,2840.41 608.94,2843.93 616.7,2843.93 654.55,2806.08 654.55,2789.23 648.27,2782.96 v1(648.27,2779.25) ; J7.10@735.19,2366.71 778.47,2409.98 778.47,2414.95 771.44,2421.98 771.44,2447.09 776.2,2451.86 776.2,2490.77 812.65,2527.21 851.55,2527.21 902.56,2578.22 902.56,2915.59 cw(c920.56,2915.59) 907.79,2928.27 ; 907.8,2928.28 1097.72,3118.2 1328.52,3118.2 1443.73,3003 1650,3003 1682.83,3035.83 1682.83,3104.8 1673.84,3113.79 1637.46,3113.79 1633.37,3109.71 1597.59,3109.71 1594.08,3106.2 L4_28.4@1594.08,3065.71
  Signal Layer 1 w6: v1(648.27,2779.25) 648.27,2775.58 654.95,2768.9 654.95,2676.22 655.32,2675.85 655.32,2573.75 722.87,2506.2 751.55,2506.2 774.69,2483.07 774.69,2450.35 767.92,2443.58 767.92,2425.49 778.47,2414.95 778.47,2409.98 J7.10@735.19,2366.71
DAC_OUT_P29: J7.13 J14.A13 L4_29.4 | length 3534.7
  TopLayer w6: v1(422.48,3073.81) 425.87,3073.81 432.21,3080.15 441.01,3080.15 441.74,3079.42 441.74,3076.4 447.74,3070.4 J14.A13@474.17,3070.4 ; L4_29.4@2570.46,2967.28 2588.18,2967.28 2613.9,2993 v1(2620,2993)
  Signal Layer 1 w6: J7.13@835.19,2566.71 794.71,2566.71 791.19,2570.22 791.19,2579.98 818.42,2607.2 885,2607.2 972.63,2694.83 972.63,2986.98 1098.17,3112.52 1098.17,3192.19 1171.07,3265.09 1577.47,3265.09 1830,3012.57 1834.97,3012.57 1857.06,2990.48 2344.45,2990.48 2374.97,3021 2605.35,3021 2620,3006.35 v1(2620,2993)
  BottomLayer w6: v1(422.48,3073.81) 426.18,3073.81 432.53,3080.15 469.81,3080.15 479.7,3070.25 575.23,2974.73 575.23,2628.47 689.48,2514.21 756.94,2514.21 791.19,2548.47 791.19,2563.19 794.71,2566.71 J7.13@835.19,2566.71
DAC_OUT_P30: J7.16 J14.B13 L4_30.4 | length 4098.7
  TopLayer w6: J14.B13@572.99,3086.15 599.43,3086.15 605.43,3092.14 605.43,3092.38 608.94,3095.9 636.39,3095.9 662.4,3069.88 677.17,3055.12 677.17,2844.25 715.21,2806.2 751.55,2806.2 774.69,2783.07 774.69,2740.15 771.44,2736.89 771.44,2721.98 778.47,2714.95 778.47,2709.98 J7.16@735.19,2666.71 ; L4_30.4@3483.84,2977.13 3497.24,2977.13 v1(3531.31,3011.2)
  Signal Layer 1 w6: J7.16@735.19,2666.71 778.47,2709.98 783.44,2709.98 790.47,2702.95 815.58,2702.95 818.83,2706.2 848.93,2706.2 933.26,2790.53 933.26,2991.67 1053.58,3111.98 1053.58,3201.34 1149.02,3296.78 1730.08,3296.78 1867.06,3159.8 1867.06,3108.97 1916.63,3059.4 2346.29,3059.4 2384.77,3097.89 2826.87,3097.89 2879.76,3045 3141,3045 3173,3077 3243.03,3077 3300.06,3019.97 3522.55,3019.97 v1(3531.31,3011.2)
DAC_OUT_P31: J7.19 J14.A16 L4_31.4 | length 3095.6
  TopLayer w6: v1(422.48,3168.3) 425.87,3168.3 432.21,3174.64 441.01,3174.64 441.74,3173.91 441.74,3170.88 447.74,3164.89 J14.A16@474.17,3164.89 ; L4_31.4@2570.45,3242.88 2583.85,3242.88 v1(2617.93,3276.95)
  Signal Layer 1 w6: v1(422.48,3168.3) 426.18,3168.3 432.53,3174.64 469.02,3174.64 494.05,3149.61 544.29,3149.61 621.4,3072.5 625.66,3072.5 636.11,3062.04 636.11,3057.79 663.39,3030.51 663.39,2840.5 689.68,2814.21 756.94,2814.21 791.19,2848.47 791.19,2863.19 794.71,2866.71 ; J7.19@835.19,2866.71 794.71,2866.71 ; v1(2617.93,3276.95) 2609.16,3285.72 2458.64,3285.72 2338.81,3165.89 2230,3165.89 2197.11,3133 1988.7,3133 1955.81,3165.89 1950.84,3165.89 1780.58,3336.15 1134.65,3336.15 1006.04,3207.54 1006.04,3109.68 898.81,3002.45 898.81,2957.5 856.52,2915.21 826.43,2915.21 791.19,2879.98 791.19,2870.22 794.71,2866.71
DAC_OUT_P32: J7.22 J14.B16 L4_32.4 | length 3625.4
  TopLayer w6: J14.B16@572.99,3180.64 599.43,3180.64 605.43,3186.63 605.43,3186.87 608.94,3190.39 624.02,3190.39 655.51,3158.89 655.51,3151.53 695.02,3112.02 763.07,3112.02 774.69,3100.39 774.69,3050.35 771.44,3047.09 771.44,3021.98 778.47,3014.95 778.47,3009.98 J7.22@735.19,2966.71 ; L4_32.4@3483.84,3252.72 3497.24,3252.72 v1(3531.31,3286.79)
  Signal Layer 1 w6: J7.22@735.19,2966.71 778.47,3009.98 783.44,3009.98 790.47,3002.95 815.58,3002.95 818.83,3006.2 853.88,3006.2 965.39,3117.71 965.39,3141.05 965.39,3220.63 1120.28,3375.52 1951.21,3375.52 2061.51,3265.21 2065.03,3261.7 2349.62,3261.7 2353.14,3265.21 2460.92,3373 3246.76,3373 3324.2,3295.56 3522.55,3295.56 v1(3531.31,3286.79)
DVCC: C7.1 C8.2 C13.2 C14.1 C83.2 IC5.52 IC5.57 IC18.52 IC18.57 L1.2 | length 1325.7
  TopLayer w8: v1(4170.06,590.09) 4200.08,560.06 4210.18,560.06 4224.47,545.78 v6(4224.47,501.51)
  TopLayer w30: v4(4478.11,826.31) 4480.65,826.31 4491.61,815.34 4595.69,815.34 4614.17,833.82 4614.17,868.87 4619.84,874.54 4603.54,890.84 4603.54,927.06 4596.39,934.21 4596.39,957.1 C7.1@4586.79,966.71 4659.11,966.71 4683.48,991.08 L1.2@4683.48,1000.9
  BottomLayer w8: IC18.57@4040.41,491.66 IC5.57@4086.67,491.66 4127.72,491.66 C83.2@4139.53,503.47 ; IC18.52@4040.41,590.09 IC5.52@4086.67,590.09 v1(4170.06,590.09) ; C83.2@4139.53,501.5 v6(4224.47,501.51)
  BottomLayer w30: v1(4170.06,590.09) 4182.84,602.86 C14.1@4182.84,688.51 4182.84,704.26 4210.39,731.82 4249.76,731.82 4357.54,839.59 4416.29,839.59 4429.57,826.31 v4(4478.11,826.31)
EEM0_LVDS0_N: IC8.48 J37.3 R56.2 R141.2 | length 1367.8
  TopLayer w6: v1(5351.62,1649.27) 5358.46,1642.42 5358.46,1629.3 R141.2@5345.96,1616.8 5378.88,1583.87 5378.88,1558.85 IC8.48@5381.88,1555.85 ; J37.3@5888.23,1879.89 5931.5,1923.17 5936.48,1923.17 5943.5,1916.14 5968.62,1916.14 5975.62,1923.13 6140.82,1923.13 6144.34,1919.62 6144.34,1917.87 R56.2@6152.76,1909.45
  Signal Layer 1 w6: v1(5351.62,1649.27) 5358.46,1642.42 5358.46,1611.82 5405.24,1565.05 5613.34,1565.05 5660.11,1611.82 5660.11,1692.76 5747.27,1779.92 5747.27,1877.07 5790.59,1920.39 5901.55,1920.39 5912.82,1931.65 5927.99,1931.65 5931.5,1928.14 5931.5,1923.17 J37.3@5888.23,1879.89
EEM0_LVDS0_P: IC8.47 J37.2 R47.2 R141.1 | length 1340.7
  TopLayer w6: v1(5377.31,1649.27) 5370.46,1642.42 5370.46,1629.3 R141.1@5382.97,1616.8 5382.97,1601.59 5401.57,1582.99 IC8.47@5401.57,1555.85 ; J37.2@5988.23,1979.89 5944.96,1936.62 5944.96,1931.65 5948.48,1928.14 5963.65,1928.14 5970.65,1935.13 6140.82,1935.13 6144.34,1938.65 6144.34,1940.4 R47.2@6152.76,1948.82
  Signal Layer 1 w6: v1(5377.31,1649.27) 5370.46,1642.42 5370.46,1616.79 5410.21,1577.05 5608.37,1577.05 5648.11,1616.79 5648.11,1697.73 5735.27,1784.89 5735.27,1882.04 5785.62,1932.39 5896.58,1932.39 5907.85,1943.65 5932.96,1943.65 5939.99,1936.62 5944.96,1936.62 J37.2@5988.23,1979.89
EEM0_LVDS1_N: IC8.4 J37.6 R57.2 R144.2 | length 1189.1
  TopLayer w6: R144.2@5288.46,1456.29 5303.67,1456.29 v1@5313.74,1466.36 ; v1(5313.87,1466.24) 5316.87,1469.24 IC8.4@5354.32,1469.24 IC8.4@5358.16,1473.08 ; J37.6@5988.23,1779.89 5947.75,1779.89 5944.23,1776.38 5944.23,1766.62 5971.46,1739.4 6056.29,1739.4 6074.86,1757.97 6150.67,1757.97 6154.18,1761.48 6154.18,1763.24 R57.2@6162.6,1771.65
  Signal Layer 1 w6: v1(5313.87,1466.24) 5320.71,1473.08 5383.01,1473.08 5431.24,1521.31 5648.89,1521.31 5790.23,1662.66 5790.23,1678.09 5832.76,1720.62 5913.84,1720.62 5973.12,1779.89 J37.6@5988.23,1779.89
EEM0_LVDS1_P: IC8.3 J37.5 R48.2 R144.1 | length 1159.3
  TopLayer w6: R144.1@5288.46,1493.3 5303.67,1493.3 ; v1(5313.87,1491.92) 5316.87,1488.92 IC8.3@5354.32,1488.92 IC8.3@5358.16,1485.08 ; J37.5@5888.23,1779.89 5928.72,1779.89 5932.23,1776.38 5932.23,1761.65 5966.49,1727.4 6061.26,1727.4 6079.83,1745.97 6150.67,1745.97 6154.18,1742.45 6154.18,1740.7 R48.2@6162.6,1732.28
  Signal Layer 1 w6: v1(5313.87,1491.92) 5320.71,1485.08 5378.04,1485.08 5426.27,1533.31 5643.92,1533.31 5778.23,1667.63 5778.23,1683.06 5827.79,1732.62 5908.87,1732.62 5922.99,1746.74 5889.84,1779.89 J37.5@5888.23,1779.89
EEM0_LVDS2_N: IC8.10 J37.9 R59.2 R147.2 | length 1257.5
  TopLayer w6: R147.2@5299.46,1337.29 5314.67,1337.29 5331.37,1353.99 v1@5386.88,1353.99 ; J37.9@5888.23,1579.89 5931.5,1623.17 5936.48,1623.17 5943.5,1616.14 5968.62,1616.14 5979.88,1627.4 6059.91,1627.4 6060.37,1627.86 6150.67,1627.86 6154.18,1624.34 6154.18,1622.59 R59.2@6162.6,1614.17
  Signal Layer 1 w6: v1(5386.88,1349.15) 5396.56,1349.15 5424,1321.71 5708.57,1321.71 5802.59,1415.74 5802.59,1593.91 5830.72,1622.03 5903.2,1622.03 5912.82,1631.65 5927.99,1631.65 5931.5,1628.14 5931.5,1623.17 J37.9@5888.23,1579.89
EEM0_LVDS2_P: IC8.9 J37.8 R49.2 R147.1 | length 1264.1
  TopLayer w6: R147.1@5299.46,1374.3 5314.67,1374.3 5318.16,1370.81 IC8.9@5354.32,1370.81 5382.86,1370.81 v1(5391.72,1379.68) ; J37.8@5988.23,1679.89 5944.96,1636.62 5944.96,1631.65 5948.48,1628.14 5963.65,1628.14 5974.91,1639.4 6054.94,1639.4 6055.4,1639.86 6150.67,1639.86 6154.18,1643.37 6154.18,1645.13 R49.2@6162.6,1653.54
  Signal Layer 1 w6: v1@5388.64,1374.05 5394.69,1368 5405.73,1356.96 5428.97,1333.71 5703.6,1333.71 5790.59,1420.71 5790.59,1582.04 5790.59,1598.88 5825.75,1634.03 5898.23,1634.03 5907.85,1643.65 5932.96,1643.65 5939.99,1636.62 5944.96,1636.62 J37.8@5988.23,1679.89
EEM0_LVDS3_N: IC8.14 J37.12 R60.2 R151.2 | length 1258.2
  TopLayer w6: v1(5401.57,1206.35) 5401.57,1223.87 5401.31,1224.13 R151.2@5406.97,1229.8 5406.97,1245 5401.57,1250.4 IC8.14@5401.57,1284.2 ; J37.12@5988.23,1479.89 5947.75,1479.89 5944.23,1476.38 5944.23,1466.62 5971.46,1439.4 6058.85,1439.4 6072.3,1452.85 6150.67,1452.85 6154.18,1456.37 6154.18,1458.12 R60.2@6162.6,1466.54
  Signal Layer 1 w6: v1(5401.57,1206.35) 5401.57,1191.83 5499.62,1191.83 5506.07,1185.37 5691.22,1185.37 5774.23,1268.39 5774.23,1331.36 5835.74,1392.87 5835.74,1501.64 5866.49,1532.39 5909.98,1532.39 5944.23,1498.13 5944.23,1483.41 5947.75,1479.89 J37.12@5988.23,1479.89
EEM0_LVDS3_P: IC8.13 J37.11 R50.2 R151.1 | length 1294.8
  TopLayer w6: v1(5375.62,1206.35) 5375.62,1224.13 R151.1@5369.96,1229.8 5369.96,1245 5381.88,1256.92 IC8.13@5381.88,1284.2 ; J37.11@5888.23,1479.89 5928.72,1479.89 5932.23,1476.38 5932.23,1461.65 5966.49,1427.4 6063.82,1427.4 6077.27,1440.85 6150.67,1440.85 6154.18,1437.34 6154.18,1435.58 R50.2@6162.6,1427.17
  Signal Layer 1 w6: v1(5375.62,1206.35) 5375.62,1186.67 5382.46,1179.83 5494.65,1179.83 5501.1,1173.37 5696.19,1173.37 5786.23,1263.42 5786.23,1326.39 5847.74,1387.9 5847.74,1496.67 5871.46,1520.39 5905.01,1520.39 5932.23,1493.16 5932.23,1483.41 5928.72,1479.89 J37.11@5888.23,1479.89
EEM0_LVDS4_N: IC9.48 J37.15 R61.2 R160.2 | length 1256.9
  TopLayer w6: IC9.48@5392.28,1042.2 5392.28,1079.93 5383.04,1089.17 R160.2@5383.04,1104.37 5395.55,1116.87 v1@5395.55,1132.89 ; J37.15@5888.23,1279.89 5931.5,1323.17 5936.48,1323.17 5943.5,1316.14 5968.62,1316.14 5975.22,1322.74 6150.67,1322.74 6154.18,1319.23 6154.18,1317.47 R61.2@6162.6,1309.06
  Signal Layer 1 w6: v1(5388.15,1132.89) 5388.15,1128.98 5395.55,1121.58 5395.55,1094.28 5459.45,1030.39 5512.5,1030.39 5512.69,1030.2 5676.74,1030.2 5833.23,1186.69 5833.23,1282.16 5879.47,1328.4 5909.56,1328.4 5912.82,1331.65 5927.99,1331.65 5931.5,1328.14 5931.5,1323.17 J37.15@5888.23,1279.89
EEM0_LVDS4_P: IC9.47 J37.14 R52.2 R160.1 | length 1234.5
  TopLayer w6: IC9.47@5411.97,1042.2 5411.97,1081.08 5420.05,1089.17 R160.1@5420.05,1104.37 5415.12,1109.3 v1(5415.12,1133.39) ; J37.14@5988.23,1379.89 5944.96,1336.62 5944.96,1331.65 5948.48,1328.14 5963.65,1328.14 5970.25,1334.74 6150.67,1334.74 6154.18,1338.25 6154.18,1340.01 R52.2@6162.6,1348.43
  Signal Layer 1 w6: v1(5415.12,1133.39) 5415.12,1126.86 5407.55,1119.29 5407.55,1099.26 5464.42,1042.39 5517.47,1042.39 5517.66,1042.2 5671.77,1042.2 5821.23,1191.66 5821.23,1287.13 5874.5,1340.4 5904.59,1340.4 5907.85,1343.65 5932.96,1343.65 5939.99,1336.62 5944.96,1336.62 J37.14@5988.23,1379.89
EEM0_LVDS5_N: IC9.4 J37.18 R62.2 R163.2 | length 1121.7
  TopLayer w6: R163.2@5313.55,945.87 5328.75,945.87 5338.47,955.58 IC9.4@5364.72,955.58 5393.15,955.58 v1(5396.15,952.58) ; J37.18@5988.23,1179.89 5947.75,1179.89 5944.23,1183.41 5944.23,1193.16 5971.46,1220.39 6029.19,1220.39 6087.27,1162.31 6153.49,1162.31 6157.01,1158.8 6157.01,1156.18 R62.2@6165.42,1147.76
  Signal Layer 1 w6: v1(5396.15,952.58) 5398.49,950.24 5408.46,950.24 5429.81,928.89 5681.37,928.89 5871.87,1119.39 5901.97,1119.39 5944.23,1161.65 5944.23,1176.38 5947.75,1179.89 J37.18@5988.23,1179.89
EEM0_LVDS5_P: IC9.3 J37.17 R53.2 R163.1 | length 1126
  TopLayer w6: R163.1@5313.55,982.87 5328.75,982.87 5336.36,975.27 IC9.3@5364.72,975.27 5393.15,975.27 v1(5396.15,978.27) ; J37.17@5888.23,1179.89 5928.72,1179.89 5932.23,1183.41 5932.23,1198.13 5966.49,1232.39 6034.16,1232.39 6092.24,1174.31 6152.8,1174.31 6156.32,1177.83 6156.32,1180.73 R53.2@6164.73,1189.15
  Signal Layer 1 w6: v1(5396.15,978.27) 5397.4,978.27 5434.78,940.89 5676.4,940.89 5866.9,1131.39 5897,1131.39 5932.23,1166.62 5932.23,1176.38 5928.72,1179.89 J37.17@5888.23,1179.89
EEM0_LVDS6_N: IC9.10 J37.21 R63.2 R166.2 | length 1349.5
  TopLayer w6: R166.2@5304.55,830.87 5319.75,830.87 5326.36,837.47 IC9.10@5364.72,837.47 5390.15,837.47 v1(5393.15,834.47) ; J37.21@5888.23,979.89 5931.5,1023.17 5936.48,1023.17 5943.5,1016.14 5958.42,1016.14 5961.67,1019.39 6047.03,1019.39 6063.55,1002.86 6148.98,1002.86 6152.49,999.35 6152.49,997.95 R63.2@6160.91,989.54
  Signal Layer 1 w6: v1(5393.15,834.47) 5403.56,834.47 5578.99,659.05 5679.65,659.05 5726.27,705.67 5726.27,828.55 5766.23,868.51 5766.23,943.55 5851.08,1028.4 5909.56,1028.4 5912.82,1031.65 5927.99,1031.65 5931.5,1028.14 5931.5,1023.17 J37.21@5888.23,979.89
EEM0_LVDS6_P: IC9.9 J37.20 R54.2 R166.1 | length 1357.1
  TopLayer w6: R166.1@5304.55,867.87 5319.75,867.87 5330.47,857.16 IC9.9@5364.72,857.16 5390.15,857.16 v1(5393.15,860.16) ; J37.20@5988.23,1079.89 5944.96,1036.62 5944.96,1031.65 5948.48,1028.14 5953.45,1028.14 5956.7,1031.39 6052,1031.39 6068.52,1014.86 6149.27,1014.86 6152.79,1018.38 6152.79,1019.65 R54.2@6161.21,1028.06
  Signal Layer 1 w6: v1(5393.15,860.16) 5394.85,860.16 5583.96,671.05 5674.67,671.05 5714.27,710.65 5714.27,833.52 5754.23,873.48 5754.23,948.52 5846.11,1040.4 5904.59,1040.4 5907.85,1043.65 5932.96,1043.65 5939.99,1036.62 5944.96,1036.62 J37.20@5988.23,1079.89
EEM0_LVDS7_N: IC9.14 J37.24 R64.2 R170.2 | length 1357.7
  TopLayer w6: IC9.14@5411.97,770.54 5411.97,740.66 5421.05,731.57 R170.2@5421.05,716.37 5421.05,701.17 5415.39,695.5 v1(5415.39,687.89) ; J37.24@5988.23,879.89 5947.75,879.89 5944.23,883.41 5944.23,893.16 5971.46,920.39 6024.97,920.39 6095.7,849.67 6149.28,849.67 6152.8,846.15 6152.8,844.75 R64.2@6161.21,836.33
  Signal Layer 1 w6: v1(5415.39,687.89) 5408.55,681.05 5408.55,659.89 5478.35,590.09 5740.91,590.09 5808.76,657.94 5808.76,891.63 5851.13,934 5908.37,934 5944.06,898.31 5944.06,883.59 5947.75,879.89 J37.24@5988.23,879.89
EEM0_LVDS7_P: IC9.13 J37.23 R55.2 R170.1 | length 1374.4
  TopLayer w6: v1(5389.71,687.89) 5389.71,695.5 5384.04,701.17 R170.1@5384.04,716.37 5384.04,731.57 5392.28,739.81 IC9.13@5392.28,770.54 ; J37.23@5888.23,879.89 5928.72,879.89 5932.23,883.41 5932.23,898.13 5966.49,932.39 6029.94,932.39 6100.67,861.67 6149.43,861.67 6152.94,865.18 6152.94,866.52 R55.2@6161.36,874.94
  Signal Layer 1 w6: v1(5389.71,687.89) 5396.55,681.05 5396.55,654.92 5473.38,578.09 5745.88,578.09 5820.76,652.97 5820.76,886.66 5856.1,922 5903.4,922 5932.06,893.34 5932.06,887.95 5928.54,884.44 5892.78,884.44 J37.23@5888.23,879.89
EEM1_LVDS0_N: IC22.48 J6.3 R98.2 R146.2 | length 1265.3
  TopLayer w5: J6.3@6600.79,1875.59 6644.83,1919.63 6648.97,1919.63 6655.12,1913.48 6668.38,1913.48 6671.45,1916.56 6767.65,1916.56 6768.45,1915.76 6855.48,1915.76 6858.41,1912.83 6858.41,1910.49 R146.2@6867.32,1901.57 ; R98.2@7383.07,2055.12 7383.07,2054.33 7391.99,2045.41 7395.56,2045.41 7396.07,2044.9 7396.07,2035.41 7389.23,2028.57 v1(7389.23,2027.56) 7389.23,2026.15 7396.07,2019.31 7396.07,2010.22 7391.73,2005.87 IC22.48@7391.73,1994.09
  Signal Layer 1 w5: J6.3@6600.79,1875.59 6644.83,1919.63 6648.97,1919.63 6655.12,1913.48 6680.74,1913.48 6690.89,1923.63 7015.82,1923.63 7140.03,2047.83 7393.15,2047.83 7396.07,2044.9 7396.07,2037.83 7389.23,2030.99 v1(7389.23,2027.56)
EEM1_LVDS0_P: IC22.47 J6.2 R98.1 R136.2 | length 1265.3
  TopLayer w5: J6.2@6700.79,1975.59 6656.75,1931.55 6656.75,1927.41 6659.68,1924.48 6663.82,1924.48 6666.89,1927.56 6772.21,1927.56 6773.01,1926.76 6855.48,1926.76 6858.41,1929.69 6858.41,1932.03 R136.2@6867.32,1940.94 ; IC22.47@7411.42,1994.09 7411.42,2005.87 7407.07,2010.22 7407.07,2019.31 7413.92,2026.15 v1(7413.92,2027.56) 7413.92,2028.57 7407.07,2035.41 7407.07,2044.9 7407.59,2045.41 7411.16,2045.41 7420.08,2054.33 R98.1@7420.08,2055.12
  Signal Layer 1 w5: J6.2@6700.79,1975.59 6656.75,1931.55 6656.75,1927.41 6659.68,1924.48 6676.19,1924.48 6686.33,1934.63 7011.27,1934.63 7135.47,2058.83 7397.7,2058.83 7407.07,2049.46 7407.07,2037.83 7413.92,2030.99 v1(7413.92,2027.56)
EEM1_LVDS1_N: IC22.4 J6.6 R103.2 R148.2 | length 1143
  TopLayer w5: J6.6@6700.79,1775.59 6659.22,1775.59 6656.29,1778.52 6656.29,1789.02 6684.6,1817.33 6855.48,1817.33 6858.41,1814.41 6858.41,1812.07 R148.2@6867.32,1803.15 ; R103.2@7307.09,1898.82 7307.87,1898.82 7316.79,1907.74 7316.79,1911.31 7317.3,1911.82 7326.79,1911.82 7334.16,1904.45 v1(7334.68,1904.45) ; v1@7334.65,1904.98 7335.9,1906.23 7362.92,1906.23 IC22.4@7364.17,1907.48
  Signal Layer 1 w5: J6.6@6700.79,1775.59 6659.22,1775.59 6656.29,1778.52 6656.29,1789.02 6683.82,1816.56 7060.46,1816.56 7155.17,1911.27 7324.41,1911.27 7331.22,1904.45 v1(7334.68,1904.45)
EEM1_LVDS1_P: IC22.3 J6.5 R103.1 R137.2 | length 1177.6
  TopLayer w5: J6.5@6600.79,1775.59 6642.36,1775.59 6645.29,1778.52 6645.29,1793.58 6680.04,1828.33 6855.48,1828.33 6858.41,1831.26 6858.41,1833.6 R137.2@6867.32,1842.52 ; R103.1@7307.09,1935.83 7307.87,1935.83 7316.79,1926.91 7316.79,1923.33 7317.3,1922.82 7326.79,1922.82 7333.63,1929.67 7334.65,1929.67 7335.9,1928.42 7362.92,1928.42 IC22.3@7364.17,1927.17
  Signal Layer 1 w5: J6.5@6600.79,1775.59 6642.36,1775.59 6645.29,1778.52 6645.29,1793.58 6679.26,1827.56 7055.9,1827.56 7150.62,1922.27 7322.78,1922.27 7329.6,1929.09 v1(7333.05,1929.09)
EEM1_LVDS2_N: IC22.10 J6.9 R106.2 R149.2 | length 1194.6
  TopLayer w5: J6.9@6600.79,1575.59 6644.83,1619.63 6648.97,1619.63 6655.12,1613.48 6668.38,1613.48 6678.52,1623.63 6722.31,1623.63 6727.04,1628.36 6855.48,1628.36 6858.41,1625.43 6858.41,1623.09 R149.2@6867.32,1614.17 ; R106.2@7307.09,1776.77 7307.87,1776.77 7316.79,1785.69 7333.46,1785.69 7335.9,1788.12 7362.92,1788.12 IC22.10@7364.17,1789.37
  Signal Layer 1 w5: J6.9@6600.79,1575.59 6644.83,1619.63 6648.97,1619.63 6655.12,1613.48 6680.74,1613.48 6690.89,1623.63 6722.31,1623.63 6740.51,1641.83 7035.34,1641.83 7188.17,1794.66 7323.42,1794.66 7330.25,1787.83 v1(7333.69,1787.83)